# Altium PCB Switch_Matrix_32_2.PCBDOC (part 2 of 9)
Units mm, origin at the board's own origin, x right, y up, seen from the top; angles counter-clockwise.
Board outline 222.54 x 100 mm, 6 copper layers (L1, P2, L3, P4, L5, L6), stack 1.61 mm thick; 629 components, 583 nets, 2332 pads, 825 vias.
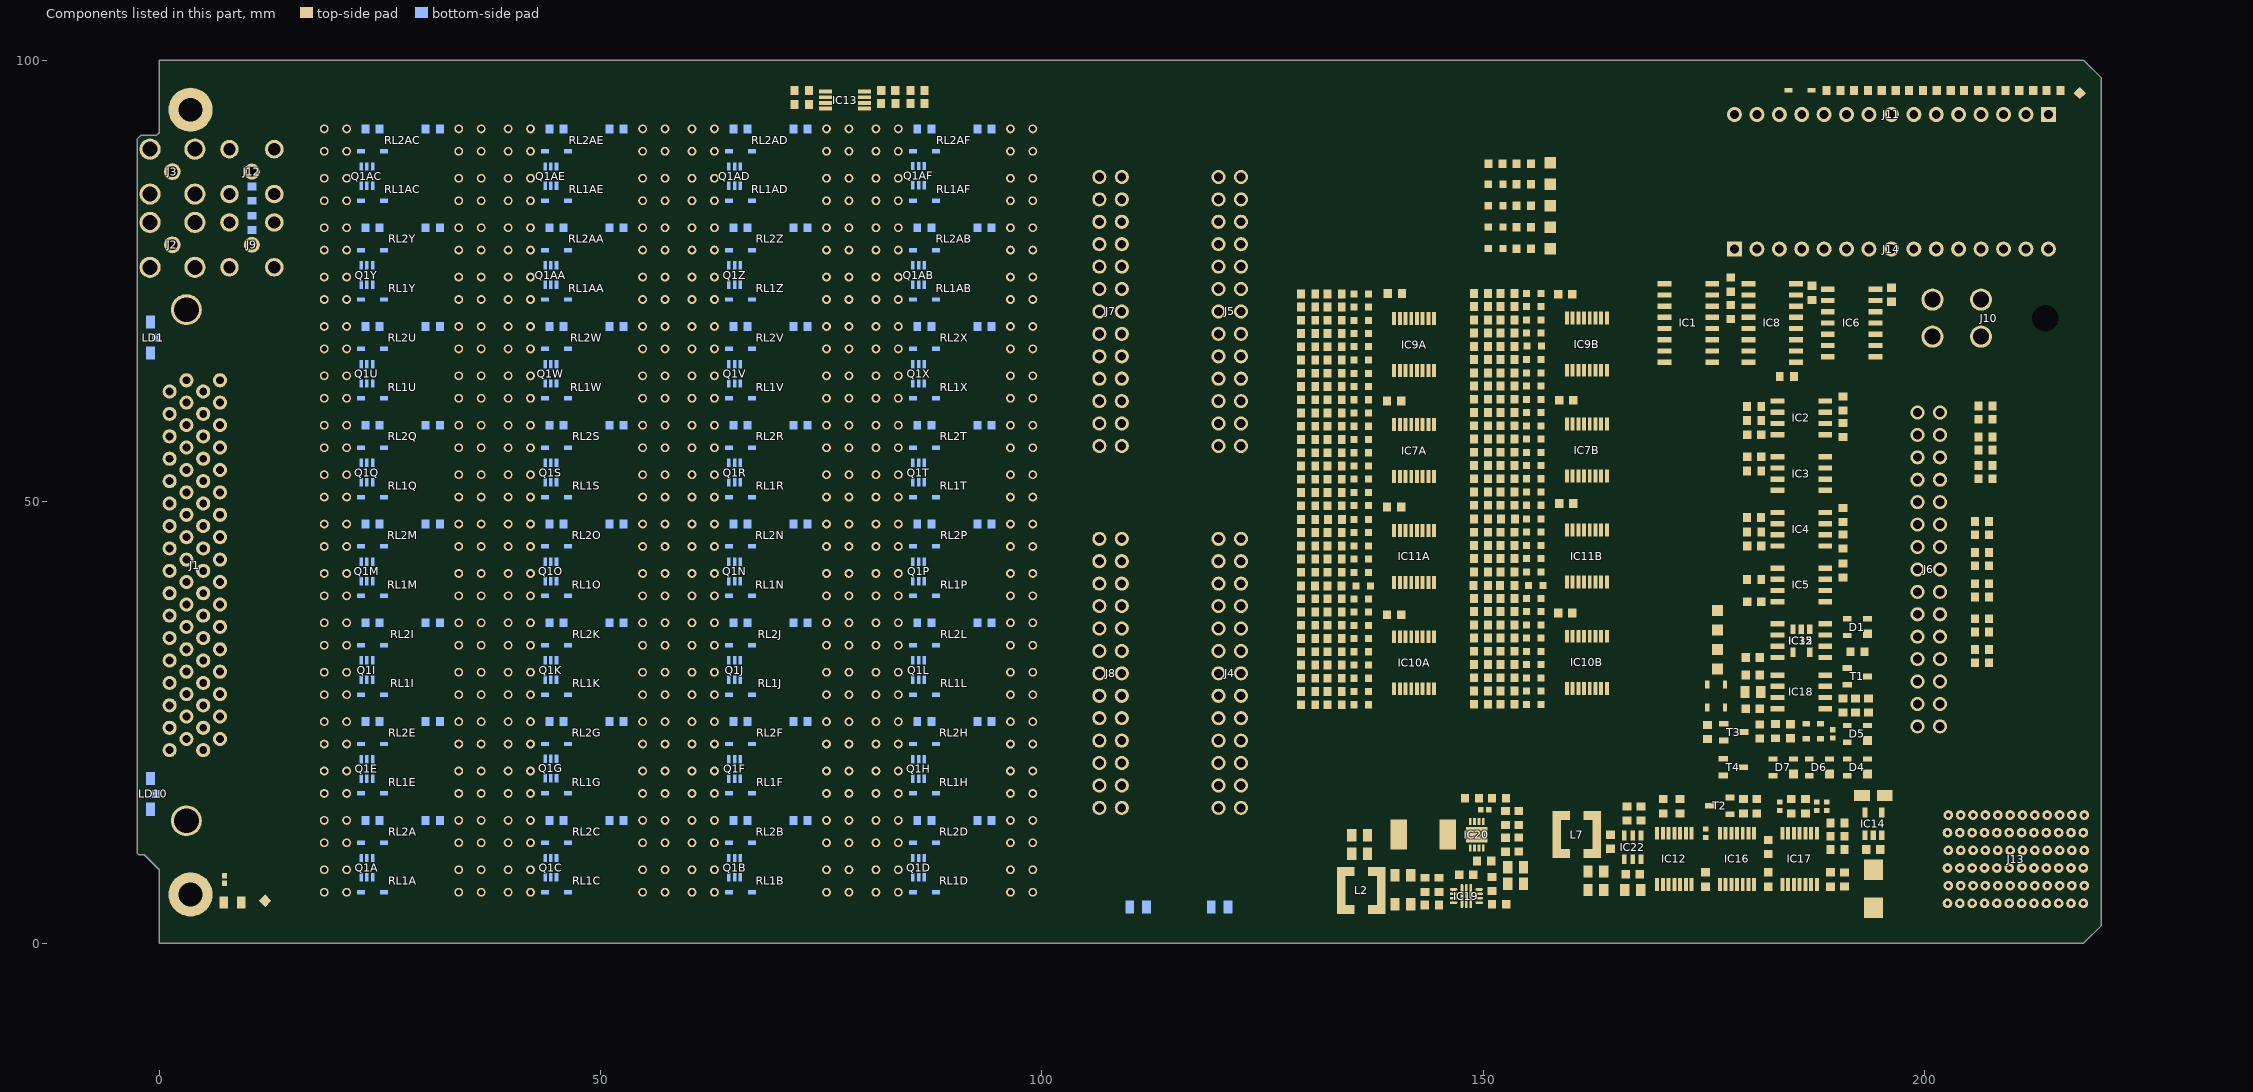
[diagram p6: the components of this part, seen from the top]

## Components (designator, comment, footprint, x,y, rotation, side; value= is the part's Value field where it differs from the comment) (continued)
R41A "2k2" RESC1608X55N 130.175,54.05 r180 top (schematic designator R41)
R41B "2k2" RESC1608X55N 149.75,54.1 r180 top (schematic designator R41)
R42A "10k" RESC1608X55N 133.175,55.55 r0 top (schematic designator R42)
R42B "10k" RESC1608X55N 152.75,55.6 r0 top (schematic designator R42)
R43A "2k2" RESC1608X55N 130.175,55.55 r180 top (schematic designator R43)
R43B "2k2" RESC1608X55N 149.75,55.6 r180 top (schematic designator R43)
R44A "10k" RESC1608X55N 133.175,57.05 r0 top (schematic designator R44)
R44B "10k" RESC1608X55N 152.75,57.1 r0 top (schematic designator R44)
R45A "2k2" RESC1608X55N 130.175,57.05 r180 top (schematic designator R45)
R45B "2k2" RESC1608X55N 149.75,57.1 r180 top (schematic designator R45)
R46A "10k" RESC1608X55N 133.175,58.55 r0 top (schematic designator R46)
R46B "10k" RESC1608X55N 152.75,58.6 r0 top (schematic designator R46)
R47A "2k2" RESC1608X55N 130.175,58.55 r180 top (schematic designator R47)
R47B "2k2" RESC1608X55N 149.75,58.6 r180 top (schematic designator R47)
R48A "10k" RESC1608X55N 133.175,60.05 r0 top (schematic designator R48)
R48B "10k" RESC1608X55N 152.75,60.1 r0 top (schematic designator R48)
R49A "2k2" RESC1608X55N 130.175,60.05 r180 top (schematic designator R49)
R49B "2k2" RESC1608X55N 149.75,60.1 r180 top (schematic designator R49)
R50A "10k" RESC1608X55N 133.175,61.55 r0 top (schematic designator R50)
R50B "10k" RESC1608X55N 152.75,61.6 r0 top (schematic designator R50)
R51A "2k2" RESC1608X55N 130.175,61.55 r180 top (schematic designator R51)
R51B "2k2" RESC1608X55N 149.75,61.6 r180 top (schematic designator R51)
R52A "10k" RESC1608X55N 133.175,63.05 r0 top (schematic designator R52)
R52B "10k" RESC1608X55N 152.75,63.1 r0 top (schematic designator R52)
R53A "2k2" RESC1608X55N 130.175,63.05 r180 top (schematic designator R53)
R53B "2k2" RESC1608X55N 149.75,63.1 r180 top (schematic designator R53)
R54A "10k" RESC1608X55N 133.175,64.55 r0 top (schematic designator R54)
R54B "10k" RESC1608X55N 152.75,64.6 r0 top (schematic designator R54)
R55A "2k2" RESC1608X55N 130.175,64.55 r180 top (schematic designator R55)
R55B "2k2" RESC1608X55N 149.75,64.6 r180 top (schematic designator R55)
R56 "24k" RESC1608X55N 167.888,14.682 r270 top
R57A "10k" RESC1608X55N 133.175,66.05 r0 top (schematic designator R57)
R57B "10k" RESC1608X55N 152.75,66.1 r0 top (schematic designator R57)
R58A "2k2" RESC1608X55N 130.175,66.05 r180 top (schematic designator R58)
R58B "2k2" RESC1608X55N 149.75,66.1 r180 top (schematic designator R58)
R59A "10k" RESC1608X55N 133.175,67.55 r0 top (schematic designator R59)
R59B "10k" RESC1608X55N 152.75,67.6 r0 top (schematic designator R59)
R60A "2k2" RESC1608X55N 130.175,67.55 r180 top (schematic designator R60)
R60B "2k2" RESC1608X55N 149.75,67.6 r180 top (schematic designator R60)
R61A "10k" RESC1608X55N 133.175,69.05 r0 top (schematic designator R61)
R61B "10k" RESC1608X55N 152.75,69.1 r0 top (schematic designator R61)
R62A "2k2" RESC1608X55N 130.175,69.05 r180 top (schematic designator R62)
R62B "2k2" RESC1608X55N 149.75,69.1 r180 top (schematic designator R62)
R63A "10k" RESC1608X55N 133.175,70.55 r0 top (schematic designator R63)
R63B "10k" RESC1608X55N 152.75,70.6 r0 top (schematic designator R63)
R64A "2k2" RESC1608X55N 130.175,70.55 r180 top (schematic designator R64)
R64B "2k2" RESC1608X55N 149.75,70.6 r180 top (schematic designator R64)
R65A "10k" RESC1608X55N 133.175,72.05 r0 top (schematic designator R65)
R65B "10k" RESC1608X55N 152.75,72.1 r0 top (schematic designator R65)
R66A "2k2" RESC1608X55N 130.175,72.05 r180 top (schematic designator R66)
R66B "2k2" RESC1608X55N 149.75,72.1 r180 top (schematic designator R66)
R67A "10k" RESC1608X55N 133.175,73.55 r0 top (schematic designator R67)
R67B "10k" RESC1608X55N 152.75,73.6 r0 top (schematic designator R67)
R68A "2k2" RESC1608X55N 130.175,73.55 r180 top (schematic designator R68)
R68B "2k2" RESC1608X55N 149.75,73.6 r180 top (schematic designator R68)
R69 "10k" RESC1608X55N 192.812,96.6 r180 top
R70 "10k" RESC1608X55N 205.262,96.6 r180 top
R71 "10k" RESC1608X55N 208.375,96.6 r0 top
R72 "10k" RESC1608X55N 151,6.7 r90 top
R73A "10k" RESC1608X55N 133.175,31.5 r0 top (schematic designator R73)
R73B "10k" RESC1608X55N 152.75,31.55 r0 top (schematic designator R73)
R74A "2k2" RESC1608X55N 130.175,31.5 r180 top (schematic designator R74)
R74B "2k2" RESC1608X55N 149.75,31.55 r180 top (schematic designator R74)
R75A "10k" RESC1608X55N 133.175,33 r0 top (schematic designator R75)
R75B "10k" RESC1608X55N 152.75,33.05 r0 top (schematic designator R75)
R76A "2k2" RESC1608X55N 130.175,33 r180 top (schematic designator R76)
R76B "2k2" RESC1608X55N 149.75,33.05 r180 top (schematic designator R76)
R77A "10k" RESC1608X55N 133.175,34.5 r0 top (schematic designator R77)
R77B "10k" RESC1608X55N 152.75,34.55 r0 top (schematic designator R77)
R78A "2k2" RESC1608X55N 130.175,34.5 r180 top (schematic designator R78)
R78B "2k2" RESC1608X55N 149.75,34.55 r180 top (schematic designator R78)
R79A "10k" RESC1608X55N 133.175,36 r0 top (schematic designator R79)
R79B "10k" RESC1608X55N 152.75,36.05 r0 top (schematic designator R79)
R80A "2k2" RESC1608X55N 130.175,36 r180 top (schematic designator R80)
R80B "2k2" RESC1608X55N 149.75,36.05 r180 top (schematic designator R80)
R81A "10k" RESC1608X55N 133.175,37.5 r0 top (schematic designator R81)
R81B "10k" RESC1608X55N 152.75,37.55 r0 top (schematic designator R81)
R82A "2k2" RESC1608X55N 130.175,37.5 r180 top (schematic designator R82)
R82B "2k2" RESC1608X55N 149.75,37.55 r180 top (schematic designator R82)
R83A "10k" RESC1608X55N 133.175,39 r0 top (schematic designator R83)
R83B "10k" RESC1608X55N 152.75,39.05 r0 top (schematic designator R83)
R84A "2k2" RESC1608X55N 130.175,39 r180 top (schematic designator R84)
R84B "2k2" RESC1608X55N 149.75,39.05 r180 top (schematic designator R84)
R85 "220" RESC1005X40N 175.2,12.43 r270 top
R86 "10k" RESC1608X55N 190.75,26.929 r270 top
R87 "75k" RESC1608X55N 214.6,96.6 r0 top
R88 "100" RESC1608X55N 190.75,42.199 r90 top
R89 "0" RESC1608X55N 192.2,26.929 r270 top
R90 "0" RESC1608X55N 85.9,95.1 r180 top
R91 "0" RESC1608X55N 82.6,95.1 r180 top
R92 "0" RESC1608X55N 85.9,96.6 r180 top
R93 "1k" RESC1608X55N 151.4,88.3 r180 top
R94 "0" RESC1608X55N 10.5,81.6 r270 bottom
R95 "10k" RESC1608X55N 178.05,71.5 r90 top
R96 "10k" RESC1608X55N 184.4,64.2 r0 top
R97 "0" RESC1608X55N 206.5,36.75 r180 top
R98A "0" RESC1608X55N 24.178,13.896 r180 bottom (schematic designator R98)
R98AA "0" RESC1608X55N 45.014,81.048 r180 bottom (schematic designator R98)
R98AB "0" RESC1608X55N 86.686,81.048 r180 bottom (schematic designator R98)
R98AC "0" RESC1608X55N 24.178,92.24 r180 bottom (schematic designator R98)
R98AD "0" RESC1608X55N 65.85,92.24 r180 bottom (schematic designator R98)
R98AE "0" RESC1608X55N 45.014,92.24 r180 bottom (schematic designator R98)
R98AF "0" RESC1608X55N 86.686,92.24 r180 bottom (schematic designator R98)
R98B "0" RESC1608X55N 65.85,13.896 r180 bottom (schematic designator R98)
R98C "0" RESC1608X55N 45.014,13.896 r180 bottom (schematic designator R98)
R98D "0" RESC1608X55N 86.686,13.896 r180 bottom (schematic designator R98)
R98E "0" RESC1608X55N 24.178,25.088 r180 bottom (schematic designator R98)
R98F "0" RESC1608X55N 65.85,25.088 r180 bottom (schematic designator R98)
R98G "0" RESC1608X55N 45.014,25.088 r180 bottom (schematic designator R98)
R98H "0" RESC1608X55N 86.686,25.088 r180 bottom (schematic designator R98)
R98I "0" RESC1608X55N 24.178,36.28 r180 bottom (schematic designator R98)
R98J "0" RESC1608X55N 65.85,36.28 r180 bottom (schematic designator R98)
R98K "0" RESC1608X55N 45.014,36.28 r180 bottom (schematic designator R98)
R98L "0" RESC1608X55N 86.686,36.28 r180 bottom (schematic designator R98)
R98M "0" RESC1608X55N 24.178,47.472 r180 bottom (schematic designator R98)
R98N "0" RESC1608X55N 65.85,47.472 r180 bottom (schematic designator R98)
R98O "0" RESC1608X55N 45.014,47.472 r180 bottom (schematic designator R98)
R98P "0" RESC1608X55N 86.686,47.472 r180 bottom (schematic designator R98)
R98Q "0" RESC1608X55N 24.178,58.664 r180 bottom (schematic designator R98)
R98R "0" RESC1608X55N 65.85,58.664 r180 bottom (schematic designator R98)
R98S "0" RESC1608X55N 45.014,58.664 r180 bottom (schematic designator R98)
R98T "0" RESC1608X55N 86.686,58.664 r180 bottom (schematic designator R98)
R98U "0" RESC1608X55N 24.178,69.856 r180 bottom (schematic designator R98)
R98V "0" RESC1608X55N 65.85,69.856 r180 bottom (schematic designator R98)
R98W "0" RESC1608X55N 45.014,69.856 r180 bottom (schematic designator R98)
R98X "0" RESC1608X55N 86.686,69.856 r180 bottom (schematic designator R98)
R98Y "0" RESC1608X55N 24.178,81.048 r180 bottom (schematic designator R98)
R98Z "0" RESC1608X55N 65.85,81.048 r180 bottom (schematic designator R98)
R99A "0" RESC1608X55N 30.99,13.896 r0 bottom (schematic designator R99)
R99AA "0" RESC1608X55N 51.826,81.048 r0 bottom (schematic designator R99)
R99AB "0" RESC1608X55N 93.498,81.048 r0 bottom (schematic designator R99)
R99AC "0" RESC1608X55N 30.99,92.24 r0 bottom (schematic designator R99)
R99AD "0" RESC1608X55N 72.662,92.24 r0 bottom (schematic designator R99)
R99AE "0" RESC1608X55N 51.826,92.24 r0 bottom (schematic designator R99)
R99AF "0" RESC1608X55N 93.498,92.24 r0 bottom (schematic designator R99)
R99B "0" RESC1608X55N 72.662,13.896 r0 bottom (schematic designator R99)
R99C "0" RESC1608X55N 51.826,13.896 r0 bottom (schematic designator R99)
R99D "0" RESC1608X55N 93.498,13.896 r0 bottom (schematic designator R99)
R99E "0" RESC1608X55N 30.99,25.088 r0 bottom (schematic designator R99)
R99F "0" RESC1608X55N 72.662,25.088 r0 bottom (schematic designator R99)
R99G "0" RESC1608X55N 51.826,25.088 r0 bottom (schematic designator R99)
R99H "0" RESC1608X55N 93.498,25.088 r0 bottom (schematic designator R99)
R99I "0" RESC1608X55N 30.99,36.28 r0 bottom (schematic designator R99)
R99J "0" RESC1608X55N 72.662,36.28 r0 bottom (schematic designator R99)
R99K "0" RESC1608X55N 51.826,36.28 r0 bottom (schematic designator R99)
R99L "0" RESC1608X55N 93.498,36.28 r0 bottom (schematic designator R99)
R99M "0" RESC1608X55N 30.99,47.472 r0 bottom (schematic designator R99)
R99N "0" RESC1608X55N 72.662,47.472 r0 bottom (schematic designator R99)
R99O "0" RESC1608X55N 51.826,47.472 r0 bottom (schematic designator R99)
R99P "0" RESC1608X55N 93.498,47.472 r0 bottom (schematic designator R99)
R99Q "0" RESC1608X55N 30.99,58.664 r0 bottom (schematic designator R99)
R99R "0" RESC1608X55N 72.662,58.664 r0 bottom (schematic designator R99)
R99S "0" RESC1608X55N 51.826,58.664 r0 bottom (schematic designator R99)
R99T "0" RESC1608X55N 93.498,58.664 r0 bottom (schematic designator R99)
R99U "0" RESC1608X55N 30.99,69.856 r0 bottom (schematic designator R99)
R99V "0" RESC1608X55N 72.662,69.856 r0 bottom (schematic designator R99)
R99W "0" RESC1608X55N 51.826,69.856 r0 bottom (schematic designator R99)
R99X "0" RESC1608X55N 93.498,69.856 r0 bottom (schematic designator R99)
R99Y "0" RESC1608X55N 30.99,81.048 r0 bottom (schematic designator R99)
R99Z "0" RESC1608X55N 72.662,81.048 r0 bottom (schematic designator R99)
R100 "0" RESC1608X55N 10.5,84.9 r90 bottom
R101 "10k" RESC1608X55N 172.3,15.5 r270 top
R102 "10k" RESC1608X55N 170.4,15.5 r270 top
R103 "10k" RESC1608X55N 181,15.5 r90 top
R104 "10k" RESC1608X55N 179.5,15.5 r270 top
R105 "10k" RESC1608X55N 190.15,13.6 r180 top
R106 "10k" RESC1608X55N 190.95,7.2 r90 top
R107 "10k" RESC1608X55N 190.15,12.1 r180 top
R108 "10k" RESC1608X55N 190.15,10.6 r180 top
R109 "10k" RESC1608X55N 186.5,15.5 r270 top
R110 "2k7" RESC1608X55N 182.3,10.9 r90 top
R111 "10k" RESC1608X55N 184.9,15.5 r270 top
R112 "0" RESC1608X55N 192.4,33 r180 top
R113 "0" RESC1608X55N 193.65,26.929 r270 top
R114 "2k7" RESC1608X55N 181.326,23.975 r90 top
R115 "10k" RESC1608X55N 175.4,23.9 r270 top
R116 "10k" RESC1608X55N 183.1,24 r270 top
R117 "10k" RESC1608X55N 143.4,6.6 r90 top
R118 "75k" RESC1608X55N 152.53,14.15 r270 top
R119 "10M" RESC2113X55N 110.9,4.1 r0 bottom
R120 "10M" RESC2113X55N 120.15,4.1 r180 bottom
R121 "75k" RESC1608X55N 148.75,16.4 r180 top
R122 "10k" RESC1608X55N 151.8,16.4 r180 top
R123 "10k" RESC1608X55N 154.03,14.15 r90 top
R124 "100" RESC1608X55N 154.03,11.15 r90 top
R125 "2k2" RESC1608X55N 154.6,81.1 r180 top
R126 "1M1" RESC2012X60N 8.3,4.6 r0 top
R127 "1k" RESC1608X55N 154.6,85.967 r180 top
R130 "22" RESC1005X40N 183.6,15.5 r90 top
R131 "22" RESC1005X40N 187.8,15.5 r90 top
R133 "22" RESC1005X40N 189.6,23.7 r90 top
R136 "22" RESC1005X40N 188.9,15.5 r90 top
R145 "0" RESC1608X55N 206.9,60.85 r180 top
R146 "0" RESC1608X55N 206.9,57.35 r180 top
R147 "0" RESC1608X55N 206.9,54.1 r180 top
R148 "0" RESC1608X55N 206.5,47.75 r180 top
R149 "0" RESC1608X55N 206.5,44.25 r180 top
R150 "0" RESC1608X55N 206.5,39.2 r180 top
R152 "0" RESC1608X55N 206.5,33.25 r180 top
R159 "1k" RESC1608X55N 154.6,88.3 r180 top
R160 "1k" RESC1608X55N 154.6,83.533 r180 top
R161 "0" RESC1608X55N 206.9,59.35 r180 top
R162 "0" RESC1608X55N 206.9,55.85 r180 top
R163 "0" RESC1608X55N 206.9,52.6 r180 top
R164 "0" RESC1608X55N 206.5,46.25 r180 top
R167 "0" RESC1608X55N 206.5,42.75 r180 top
R168 "0" RESC1608X55N 206.5,40.7 r180 top
R169 "0" RESC1608X55N 206.5,35.25 r180 top
R170 "0" RESC1608X55N 206.5,31.75 r180 top
R175 "10k" RESC1608X55N 72.8,96.6 r180 top
R177 "10k" RESC1608X55N 72.8,95 r180 top
RL1A "2342-05-000" 2342-05-000 27.584,7.03 r0 top locked value=5VDC (schematic designator RL1)
RL1AA "2342-05-000" 2342-05-000 48.42,74.182 r0 top locked value=5VDC (schematic designator RL1)
RL1AB "2342-05-000" 2342-05-000 90.092,74.182 r0 top locked value=5VDC (schematic designator RL1)
RL1AC "2342-05-000" 2342-05-000 27.584,85.374 r0 top locked value=5VDC (schematic designator RL1)
RL1AD "2342-05-000" 2342-05-000 69.256,85.374 r0 top locked value=5VDC (schematic designator RL1)
RL1AE "2342-05-000" 2342-05-000 48.42,85.374 r0 top locked value=5VDC (schematic designator RL1)
RL1AF "2342-05-000" 2342-05-000 90.092,85.374 r0 top locked value=5VDC (schematic designator RL1)
RL1B "2342-05-000" 2342-05-000 69.256,7.03 r0 top locked value=5VDC (schematic designator RL1)
RL1C "2342-05-000" 2342-05-000 48.42,7.03 r0 top locked value=5VDC (schematic designator RL1)
RL1D "2342-05-000" 2342-05-000 90.092,7.03 r0 top locked value=5VDC (schematic designator RL1)
RL1E "2342-05-000" 2342-05-000 27.584,18.222 r0 top locked value=5VDC (schematic designator RL1)
RL1F "2342-05-000" 2342-05-000 69.256,18.222 r0 top locked value=5VDC (schematic designator RL1)
RL1G "2342-05-000" 2342-05-000 48.42,18.222 r0 top locked value=5VDC (schematic designator RL1)
RL1H "2342-05-000" 2342-05-000 90.092,18.222 r0 top locked value=5VDC (schematic designator RL1)
RL1I "2342-05-000" 2342-05-000 27.584,29.414 r0 top locked value=5VDC (schematic designator RL1)
RL1J "2342-05-000" 2342-05-000 69.256,29.414 r0 top locked value=5VDC (schematic designator RL1)
RL1K "2342-05-000" 2342-05-000 48.42,29.414 r0 top locked value=5VDC (schematic designator RL1)
RL1L "2342-05-000" 2342-05-000 90.092,29.414 r0 top locked value=5VDC (schematic designator RL1)
RL1M "2342-05-000" 2342-05-000 27.584,40.606 r0 top locked value=5VDC (schematic designator RL1)
RL1N "2342-05-000" 2342-05-000 69.256,40.606 r0 top locked value=5VDC (schematic designator RL1)
RL1O "2342-05-000" 2342-05-000 48.42,40.606 r0 top locked value=5VDC (schematic designator RL1)
RL1P "2342-05-000" 2342-05-000 90.092,40.606 r0 top locked value=5VDC (schematic designator RL1)
RL1Q "2342-05-000" 2342-05-000 27.584,51.798 r0 top locked value=5VDC (schematic designator RL1)
RL1R "2342-05-000" 2342-05-000 69.256,51.798 r0 top locked value=5VDC (schematic designator RL1)
RL1S "2342-05-000" 2342-05-000 48.42,51.798 r0 top locked value=5VDC (schematic designator RL1)
RL1T "2342-05-000" 2342-05-000 90.092,51.798 r0 top locked value=5VDC (schematic designator RL1)
RL1U "2342-05-000" 2342-05-000 27.584,62.99 r0 top locked value=5VDC (schematic designator RL1)
RL1V "2342-05-000" 2342-05-000 69.256,62.99 r0 top locked value=5VDC (schematic designator RL1)
RL1W "2342-05-000" 2342-05-000 48.42,62.99 r0 top locked value=5VDC (schematic designator RL1)
RL1X "2342-05-000" 2342-05-000 90.092,62.99 r0 top locked value=5VDC (schematic designator RL1)
RL1Y "2342-05-000" 2342-05-000 27.584,74.182 r0 top locked value=5VDC (schematic designator RL1)
RL1Z "2342-05-000" 2342-05-000 69.256,74.182 r0 top locked value=5VDC (schematic designator RL1)
RL2A "2342-05-000" 2342-05-000 27.584,12.626 r0 top locked value=5VDC (schematic designator RL2)
RL2AA "2342-05-000" 2342-05-000 48.42,79.778 r0 top locked value=5VDC (schematic designator RL2)
RL2AB "2342-05-000" 2342-05-000 90.092,79.778 r0 top locked value=5VDC (schematic designator RL2)
RL2AC "2342-05-000" 2342-05-000 27.584,90.97 r0 top locked value=5VDC (schematic designator RL2)
RL2AD "2342-05-000" 2342-05-000 69.256,90.97 r0 top locked value=5VDC (schematic designator RL2)
RL2AE "2342-05-000" 2342-05-000 48.42,90.97 r0 top locked value=5VDC (schematic designator RL2)
RL2AF "2342-05-000" 2342-05-000 90.092,90.97 r0 top locked value=5VDC (schematic designator RL2)
RL2B "2342-05-000" 2342-05-000 69.256,12.626 r0 top locked value=5VDC (schematic designator RL2)
RL2C "2342-05-000" 2342-05-000 48.42,12.626 r0 top locked value=5VDC (schematic designator RL2)
RL2D "2342-05-000" 2342-05-000 90.092,12.626 r0 top locked value=5VDC (schematic designator RL2)
RL2E "2342-05-000" 2342-05-000 27.584,23.818 r0 top locked value=5VDC (schematic designator RL2)
RL2F "2342-05-000" 2342-05-000 69.256,23.818 r0 top locked value=5VDC (schematic designator RL2)
RL2G "2342-05-000" 2342-05-000 48.42,23.818 r0 top locked value=5VDC (schematic designator RL2)
RL2H "2342-05-000" 2342-05-000 90.092,23.818 r0 top locked value=5VDC (schematic designator RL2)
RL2I "2342-05-000" 2342-05-000 27.584,35.01 r0 top locked value=5VDC (schematic designator RL2)
RL2J "2342-05-000" 2342-05-000 69.256,35.01 r0 top locked value=5VDC (schematic designator RL2)
RL2K "2342-05-000" 2342-05-000 48.42,35.01 r0 top locked value=5VDC (schematic designator RL2)
RL2L "2342-05-000" 2342-05-000 90.092,35.01 r0 top locked value=5VDC (schematic designator RL2)
RL2M "2342-05-000" 2342-05-000 27.584,46.202 r0 top locked value=5VDC (schematic designator RL2)
RL2N "2342-05-000" 2342-05-000 69.256,46.202 r0 top locked value=5VDC (schematic designator RL2)
RL2O "2342-05-000" 2342-05-000 48.42,46.202 r0 top locked value=5VDC (schematic designator RL2)
RL2P "2342-05-000" 2342-05-000 90.092,46.202 r0 top locked value=5VDC (schematic designator RL2)
RL2Q "2342-05-000" 2342-05-000 27.584,57.394 r0 top locked value=5VDC (schematic designator RL2)
RL2R "2342-05-000" 2342-05-000 69.256,57.394 r0 top locked value=5VDC (schematic designator RL2)
RL2S "2342-05-000" 2342-05-000 48.42,57.394 r0 top locked value=5VDC (schematic designator RL2)
RL2T "2342-05-000" 2342-05-000 90.092,57.394 r0 top locked value=5VDC (schematic designator RL2)
RL2U "2342-05-000" 2342-05-000 27.584,68.586 r0 top locked value=5VDC (schematic designator RL2)
RL2V "2342-05-000" 2342-05-000 69.256,68.586 r0 top locked value=5VDC (schematic designator RL2)
RL2W "2342-05-000" 2342-05-000 48.42,68.586 r0 top locked value=5VDC (schematic designator RL2)
RL2X "2342-05-000" 2342-05-000 90.092,68.586 r0 top locked value=5VDC (schematic designator RL2)
RL2Y "2342-05-000" 2342-05-000 27.584,79.778 r0 top locked value=5VDC (schematic designator RL2)
RL2Z "2342-05-000" 2342-05-000 69.256,79.778 r0 top locked value=5VDC (schematic designator RL2)
SCREW1 "2 -56 UNC" TYCO_786585-2 19.1,-7.5 r180 top
SCREW2 "2 -56 UNC" TYCO_786585-2 38.5,-7.1 r180 top
T1 "BSS138LT1G" SOT95P240X110-3N 192.4,30.2 r0 top
T2 "BSS138LT1G" SOT95P240X110-3N 176.809,15.548 r180 top
T3 "BSS138LT1G" SOT95P240X110-3N 178.4,23.9 r0 top
T4 "BSS138LT1G" SOT95P240X110-3N 178.35,19.925 r0 top
TP1 "Test Point" TPS127 176.551,35.46 r0 top
TP2 "Test Point" TPS127 176.551,33.26 r0 top
TP3 "Test Point" TPS127 176.551,31.06 r0 top
TP4 "Test Point" TPS127 157.6,81.1 r180 top
TP5 "Test Point" TPS127 157.6,83.533 r180 top
TP7 "Test Point" TPS127 157.6,78.667 r90 top
TP11 "Test Point" TPS127 157.6,85.967 r180 top
TP16 "Test Point" TPS127 157.6,88.4 r90 top
TP17 "Test Point" TPS127 176.551,37.66 r180 top

## Footprints (in the part's own frame and the unit in brackets; to place one, negate y for a bottom-side part, rotate by r counter-clockwise, add the part's x,y. Pads: shape width x height; smd on the part's side, far side on the other; paste and mask are expansions set on the pad)
3M_N2526-6002RB [mm] "26 Contacts - Straight .100\" x .100\" Low Profile Four-Wall Header"
  round 1.6 hole 1: 1(-15.24,-1.27) 2(-15.24,1.27) 3(-12.7,-1.27) 4(-12.7,1.27) 5(-10.16,-1.27) 6(-10.16,1.27) 7(-7.62,-1.27) 8(-7.62,1.27) 9(-5.08,-1.27) 10(-5.08,1.27) 11(-2.54,-1.27) 12(-2.54,1.27) 13(0,-1.27) 14(0,1.27) 15(2.54,-1.27) 16(2.54,1.27) 17(5.08,-1.27) 18(5.08,1.27) 19(7.62,-1.27) 20(7.62,1.27) 21(10.16,-1.27) 22(10.16,1.27) 23(12.7,-1.27) 24(12.7,1.27) 25(15.24,-1.27) 26(15.24,1.27)
  silkscreen extent -20.17,-4.85 20.17,4.52, body extent -20.17,-4.11 20.17,4.52, height 9.91
3M_N2530-6002RB [mm] "30 Contacts - Straight .100\" x .100\" Low Profile Four-Wall Header"
  round 1.6 hole 1: 1(-17.78,-1.27) 2(-17.78,1.27) 3(-15.24,-1.27) 4(-15.24,1.27) 5(-12.7,-1.27) 6(-12.7,1.27) 7(-10.16,-1.27) 8(-10.16,1.27) 9(-7.62,-1.27) 10(-7.62,1.27) 11(-5.08,-1.27) 12(-5.08,1.27) 13(-2.54,-1.27) 14(-2.54,1.27) 15(0,-1.27) 16(0,1.27) 17(2.54,-1.27) 18(2.54,1.27) 19(5.08,-1.27) 20(5.08,1.27) 21(7.62,-1.27) 22(7.62,1.27) 23(10.16,-1.27) 24(10.16,1.27) 25(12.7,-1.27) 26(12.7,1.27) 27(15.24,-1.27) 28(15.24,1.27) 29(17.78,-1.27) 30(17.78,1.27)
  silkscreen extent -22.71,-4.85 22.71,4.52, body extent -22.71,-4.11 22.71,4.52, height 9.91
2342-05-000 [mm] "Reed Relay DPDT (2 Form C) 5VDC Coil Through Hole"
  round 1 hole 0.6: 1(-8.89,-1.27) 2(-6.35,-1.27) 3(6.35,-1.27) 4(8.89,-1.27) 5(8.89,1.27) 6(6.35,1.27) 7(-6.35,1.27) 8(-8.89,1.27)
  silkscreen extent -10.29,-2.67 10.29,2.67, body extent -9.99,-2.49 9.99,2.49, height 9.04
AMPHENOL_919-383J-51A [mm] "50 Ohm, RF Connector, MCX Right Angle PCB Receptacle Jack"
  round 1.9 hole 1.2: 1(0,0)
  round 2.4 hole 1.7: 2(-2.54,2.54) 2(-2.54,-2.54) 2(2.54,2.54) 2(2.54,-2.54)
  silkscreen extent -3,-3 6.5,3, body extent -3,-3 6.5,3, height 6
AMPHENOL_10052825-101LF [mm] "72 Contacts, 2mm Pitch, 6 Columns, 4 Pairs per Column, 4 Walls, Right Angle Header"
  round 1.1 hole 0.5: A1(-5,-7.65) A2(-3,-7.75) A3(-1,-7.65) A4(1,-7.75) A5(3,-7.65) A6(5,-7.75) B1(-5,-6.25) B2(-3,-6.35) B3(-1,-6.25) B4(1,-6.35) B5(3,-6.25) B6(5,-6.35) C1(-5,-4.85) C2(-3,-4.95) C3(-1,-4.85) C4(1,-4.95) C5(3,-4.85) C6(5,-4.95) D1(-5,-3.45) D2(-3,-3.55) D3(-1,-3.45) D4(1,-3.55) D5(3,-3.45) D6(5,-3.55) E1(-5,-2.05) E2(-3,-2.15) E3(-1,-2.05) E4(1,-2.15) E5(3,-2.05) E6(5,-2.15) F1(-5,-0.65) F2(-3,-0.75) F3(-1,-0.65) F4(1,-0.75) F5(3,-0.65) F6(5,-0.75) G1(-5,0.75) G2(-3,0.65) G3(-1,0.75) G4(1,0.65) G5(3,0.75) G6(5,0.65) H1(-5,2.15) H2(-3,2.05) H3(-1,2.15) H4(1,2.05) H5(3,2.15) H6(5,2.05) I1(-5,3.55) I2(-3,3.45) I3(-1,3.55) I4(1,3.45) I5(3,3.55) I6(5,3.45) J1(-5,4.95) J2(-3,4.85) J3(-1,4.95) J4(1,4.85) J5(3,4.95) J6(5,4.85) K1(-5,6.35) K2(-3,6.25) K3(-1,6.35) K4(1,6.25) K5(3,6.35) K6(5,6.25) L1(-5,7.75) L2(-3,7.65) L3(-1,7.75) L4(1,7.65) L5(3,7.75) L6(5,7.65)
  silkscreen extent -6.95,-21.95 6.95,11.85, body extent -6.95,-21.95 6.95,11.85, height 15.25
CAPC1005X55N [mm] "Capacitor, Non-Polarized, Chip; 1.00mm L X 0.50mm W X 0.70mm H, IPC Medium Density"
  rect 0.62x0.62 smd: 1(-0.45,0) 2(0.45,0)
  body extent -0.52,-0.27 0.53,0.28, height 0.55
CAPC1608X87N [mm] "Chip Capacitor, Body 1.6x0.8mm IPC Medium Density"
  rect 0.95x1 smd: 1(-0.8,0) 2(0.8,0)
  body extent -0.87,-0.47 0.88,0.48, height 0.87
CAPC2012X135N [mm] "Chip Capacitor, Body 2.0x1.25mm, IPC Medium Density"
  rect 1.05x1.4 smd: 1(-0.9,0) 2(0.9,0)
  silkscreen extent 0,-0.58 0,0.58, body extent -1.05,-0.67 1.05,0.68, height 1.25
CAPMP3216X180N [mm] "Capacitor, Polarized, Molded  Body 3.2x1.6mm, IPC Medium Density"
  rect 1.8x1.25 smd: 1(-1.3,0) 2(1.3,0)
  silkscreen extent -2.4,-0.7 0,1.25, body extent -1.7,-0.9 1.7,0.9, height 1.6
DIOM5336X265N [mm] "DO-214-AA/SMB Diode, Molded Body; 5.34mm L X 3.625mm W X 2.65mm H, IPC Medium Density"
  rect 2.3x2.15 smd: 1(-2.15,0) 2(2.15,0)
  silkscreen extent -3.92,-1.8 2.65,1.8, body extent -2.7,-1.95 2.7,1.95, height 2.4
FIDUCIAL_TOP_C100-200 [mm] "Round Fiducial Target, Top Layer, 1.0mm, Top Solder 2.0mm, Keepout =2.0mm"
  round 1 smd paste-0.51 mask+0.5: FTG2(0,0)
  L1 keep-out circle w0.1: c0,0 r1
FIDUCIAL_TOP_S100-200 [mm] "Square Fiducial Target, Top Layer, 1.0mm, Top Solder 2.0mm, Keepout =2.0mm"
  rect 1x1 smd rot 45 paste-0.51 mask+0.5: 1(0,0)
  L1 keep-out region: 1.414,0 0,-1.414 -1.414,0 0,1.414
IND_TDK_SPM6530 [mm] "SMD Inductor, 7.1mm L X 6.5mm W X 3mm H, TDK SPM6530 Series"
  rect 1.85x3.4 smd: 1(-2.775,0) 2(2.775,0)
  silkscreen extent -3.5,-3.2 3.5,3.2, body extent -3.6,-3.2 3.6,3.2, height 3.1
IND_WURTH_WE-TPC_4828 [mm] "Shielded Tiny Power Inductor, Body 4.8x4.8mm"
  rect 0.95x5.3 smd: 1(-2.275,0) 2(2.275,0)
  rect 1.05x1.014 smd: 1(-1.275,2.143) 1(-1.275,-2.143) 2(1.275,2.143) 2(1.275,-2.143)
  L1 region: 2.75,-2.65 0.75,-2.65 0.75,-1.636 1.394,-1.138 1.753,-0.407 1.753,0.407 1.394,1.138 0.75,1.636 0.75,1.636 0.75,2.65 2.75,2.65
  L1 region: -2.75,-2.65 -0.75,-2.65 -0.75,-1.636 -1.394,-1.138 -1.753,-0.407 -1.753,0.407 -1.394,1.138 -0.75,1.636 -0.75,1.636 -0.75,2.65 -2.75,2.65
  L1 region: 0.75,-2.65 2.75,-2.65 2.75,2.65 0.75,2.65 0.75,1.636 1.394,1.138 1.753,0.407 1.753,-0.407 1.394,-1.138 0.75,-1.636 0.75,-1.636
  silkscreen extent -0.35,-2.4 0.35,2.4, body extent -2.4,-2.4 2.4,2.4, height 2.8
LED_AVAGO_HSMC-C110 [mm] "Red Chip LED, 2-Leads, Body 3.3x1.6mm, Side Emitting Package"
  rect 1.5x1 smd: 1(-1.75,0) 2(1.75,0)
  rect 0.9x0.9 smd: 3(0,-0.65)
  silkscreen extent -1.87,-1.28 0.86,1.3, body extent -1.65,-0.3 1.65,1.29, height 1
LED_AVAGO_HSME-C110 [mm] "Green Chip LED, 2-Leads, Body 3.3x1.6mm, Side Emitting Package"
  rect 1.5x1 smd: 1(-1.75,0) 2(1.75,0)
  rect 0.9x0.9 smd: 3(0,-0.65)
  silkscreen extent -1.87,-1.28 0.86,1.3, body extent -1.65,-0.3 1.65,1.29, height 1
LED_KINGBRIGHT_KP-1608CGCK [mm] "SMT Green LED, Case 0603, Body L 1.60mm x W 0.80mm x H 1.10mm"
  rect 0.8x0.8 smd: 1(-0.825,0) 2(0.825,0)
  silkscreen extent -1.83,-0.4 0.08,0.4, body extent -0.8,-0.4 0.8,0.4, height 1.1
LED_KINGBRIGHT_KPH-1608CGCK [mm] "SMT Green LED, Case 0603, Body L 1.6 x W 0.8mm H 0.65mm"
  rect 0.8x0.8 smd: 1(-0.825,0) 2(0.825,0)
  silkscreen extent -1.82,-0.4 0.08,0.4, body extent -0.8,-0.4 0.8,0.4, height 0.65
MOLEX_39-30-0040 [mm] "4.20mm (.165\") Pitch Mini-Fit Jr. Header, Dual Row, Right Angle with Snap-in Plastic Peg PCB Lock, 4 Circuits"
  round 2.5 hole 1.8: 1(-2.1,2.75) 2(2.1,2.75) 3(-2.1,-2.75) 4(2.1,-2.75)
  round 1 hole 3 unplated mask+1: 5(0,10.05)
  silkscreen extent -5.2,-1.24 4.8,16.65, body extent -5.2,-3.28 4.8,16.65, height 11.4
MTG270_500 [mm] "Plated Through Hole: Hole Dia.=2.7mm Pad Dia.=5.0mm"
  round 5 / inner round 4 / far side round 5 hole 2.7: 1(0,0)
"PCBM_ARDUINO NANO RP2040" [mm] "Arduino NANO RP2040 Printed Circuit Board Module"
  silkscreen extent -23.05,-8.89 21.6,8.89, body extent -23.05,-8.89 21.6,8.89, height 15.33
RESC1005X40N [mm] "Chip Resistor, EIA 0402, Metric 1005, Body 1.0x0.5mm, IPC Medium Density"
  rect 0.58x0.62 smd: 1(-0.47,0) 2(0.47,0)
  body extent -0.52,-0.27 0.53,0.28, height 0.4
RESC1608X55N [mm] "Chip Resistor, EIA 0603, Metric 1608, Body 1.6x0.8mm, IPC Medium Density"
  rect 0.9x1 smd: 1(-0.8,0) 2(0.8,0)
  body extent -0.87,-0.47 0.88,0.48, height 0.55
RESC2012X60N [mm] "Chip Resistor, EIA 0805, Metric 2012, Body 2.0x1.2mm, IPC Medium Density"
  rect 0.95x1.4 smd: 1(-1,0) 2(1,0)
  silkscreen extent 0,-0.55 0,0.55, body extent -1.1,-0.67 1.1,0.68, height 0.6
RESC2113X55N [mm] "Chip Resistor, EIA 0805, Metric 2113, Body 2.05x1.3mm, IPC Medium Density"
  rect 1x1.45 smd: 1(-0.95,0) 2(0.95,0)
  silkscreen extent 0,-0.55 0,0.55, body extent -1,-0.62 1,0.63, height 0.55
SAMTEC_MCX-J-P-H-ST-TH1 [mm] "Straight Through-hole 50 Ohm Mini RF Jack, MCX Serie"
  round 1.8 hole 1.1: 1(0,0)
  round 2.1 hole 1.4: 2(-2.54,-2.54) 2(-2.54,2.54) 2(2.54,-2.54) 2(2.54,2.54)
  silkscreen extent -3,-3 3,3, body extent -3,-3 3,3, height 5.81
SAMTEC_SSW-115-01-X-S [mm] "15 Contacts, Pitch 2.54mm, Single Row Through Mount Straight Socket (Lead Length 2.64mm)"
  rect 1.7x1.7 hole 1: 1(-17.78,0)
  round 1.7 hole 1: 2(-15.24,0) 3(-12.7,0) 4(-10.16,0) 5(-7.62,0) 6(-5.08,0) 7(-2.54,0) 8(0,0) 9(2.54,0) 10(5.08,0) 11(7.62,0) 12(10.16,0) 13(12.7,0) 14(15.24,0) 15(17.78,0)
  silkscreen extent -19.3,-1.21 19.3,1.95, body extent -19.3,-1.21 19.3,1.21, height 8.51
SOD2512X110N [mm] "Small Outline Diode (SOD-323), 1.70mm W X 1.25mm L X 1.10mm H body,  IPC Medium Density"
  rect 0.9x0.5 smd: 1(-1.3,0) 2(1.3,0)
  silkscreen extent -1.62,-0.65 0.85,0.88, body extent -1.35,-0.67 1.35,0.68, height 1.1
SOD-523F [mm] "Small Outline Diode Flat Lead (SOD-523F), Body; 1.80mm L X 1mm W X 0.85mm H"
  rect 0.6x0.8 smd: 1(-0.85,0) 2(0.85,0)
  silkscreen extent -1.87,-0.5 0.2,0.52, body extent -0.91,-0.5 0.89,0.5, height 0.85
SOIC127P600X175-8N [mm] "SOIC 8, Pitch 1.27mm - Body 4x5mm, IPC Medium Density"
  rect 1.55x0.6 smd: 1(-2.7,1.905) 2(-2.7,0.635) 3(-2.7,-0.635) 4(-2.7,-1.905) 5(2.7,-1.905) 6(2.7,-0.635) 7(2.7,0.635) 8(2.7,1.905)
  silkscreen extent -2.53,-2.5 1.55,2.88, body extent -3.1,-2.5 3.1,2.5, height 1.75
SOIC127P600X175-14N [mm] "SOIC 14, Pitch 1.27mm - Body 4x8.75mm, IPC Medium Density"
  rect 1.55x0.6 smd: 1(-2.7,3.81) 2(-2.7,2.54) 3(-2.7,1.27) 4(-2.7,0) 5(-2.7,-1.27) 6(-2.7,-2.54) 7(-2.7,-3.81) 8(2.7,-3.81) 9(2.7,-2.54) 10(2.7,-1.27) 11(2.7,0) 12(2.7,1.27) 13(2.7,2.54) 14(2.7,3.81)
  silkscreen extent -2.52,-4.4 1.55,4.78, body extent -3.1,-4.37 3.1,4.38, height 1.75
SOIC127P600X175-16N [mm] "SOIC 16, Pitch 1.27mm - Body 4x10mm, IPC Medium Density"
  rect 1.55x0.6 smd: 1(-2.7,4.445) 2(-2.7,3.175) 3(-2.7,1.905) 4(-2.7,0.635) 5(-2.7,-0.635) 6(-2.7,-1.905) 7(-2.7,-3.175) 8(-2.7,-4.445) 9(2.7,-4.445) 10(2.7,-3.175) 11(2.7,-1.905) 12(2.7,-0.635) 13(2.7,0.635) 14(2.7,1.905) 15(2.7,3.175) 16(2.7,4.445)
  silkscreen extent -2.45,-5 1.55,5.37, body extent -3.1,-5 3.1,5, height 1.75
SON50P300X300X80-9N-R175X248 [mm] "SON, (DFN) 0.50mm,pitch; 8 pin,3.00mm W X 3.00mm L X 0.80mm H body (w/thermal tab 1.75 X2.48mm), IPC Medium Density"
  rect 0.8x0.3 smd: 1(-1.5,0.75) 2(-1.5,0.25) 3(-1.5,-0.25) 4(-1.5,-0.75) 5(1.5,-0.75) 6(1.5,-0.25) 7(1.5,0.25) 8(1.5,0.75)
  rect 1.75x2.45 smd: 9(0,0)
  silkscreen extent -2.52,-1.5 1.5,1.5, body extent -1.55,-1.55 1.55,1.55, height 0.8
SOP65P490X109-8N [mm] "SOP, 0.65mm pitch; 8 pin,3.00mm W X 3.00mm L X 1.09mm H bodyI, PC Medium Density"
  rect 1.5x0.45 smd: 1(-2.2,0.975) 2(-2.2,0.325) 3(-2.2,-0.325) 4(-2.2,-0.975) 5(2.2,-0.975) 6(2.2,-0.325) 7(2.2,0.325) 8(2.2,0.975)
  silkscreen extent -2.82,-1.5 1.12,1.82, body extent -2.45,-1.55 2.45,1.55, height 1.09
SOP65P640X110-14N [mm] "SOP, 14-Leads, Body 4.4x5mm (max), Pitch 0.65mm, IPC Medium Density"
  rect 1.45x0.45 smd: 1(-2.9,1.95) 2(-2.9,1.3) 3(-2.9,0.65) 4(-2.9,0) 5(-2.9,-0.65) 6(-2.9,-1.3) 7(-2.9,-1.95) 8(2.9,-1.95) 9(2.9,-1.3) 10(2.9,-0.65) 11(2.9,0) 12(2.9,0.65) 13(2.9,1.3) 14(2.9,1.95)
  silkscreen extent -3.47,-2.5 1.85,2.83, body extent -3.12,-2.55 3.12,2.55, height 1.1
SOP65P640X120-16N [mm] "SOP, 0.65mm pitch; 16 pin, 4.40mm W X 5.00mm L X 1.20mm H body IPC Medium Density"
  rect 1.45x0.45 smd: 1(-2.95,2.275) 2(-2.95,1.625) 3(-2.95,0.975) 4(-2.95,0.325) 5(-2.95,-0.325) 6(-2.95,-0.975) 7(-2.95,-1.625) 8(-2.95,-2.275) 9(2.95,-2.275) 10(2.95,-1.625) 11(2.95,-0.975) 12(2.95,-0.325) 13(2.95,0.325) 14(2.95,0.975) 15(2.95,1.625) 16(2.95,2.275)
  silkscreen extent -3.07,-2.55 1.85,3.17, body extent -3.12,-2.55 3.12,2.55, height 1.2
SOT65P210X110-6N [mm] "SOT363, SC70-6, SOT, 0.65mm Pitch, 6 Pin, 1.25mm W X 2.00mm L X 1.10mm H, IPC Medium Density"
  rect 0.95x0.4 smd: 1(-1.1,0.65) 2(-1.1,0) 3(-1.1,-0.65) 4(1.1,-0.65) 5(1.1,0) 6(1.1,0.65)
  silkscreen extent -1.42,-1 0.3,1.48, body extent -1.2,-1.1 1.2,1.1, height 1.1
SOT95P240X110-3N [mm] "SOT23 3-Leads, Pitch 0.95mm, Body 1.3x2.9mm, IPC Medium Density"
  rect 1.05x0.65 smd: 1(-1.15,0.95) 2(-1.15,-0.95) 3(1.15,0)
  silkscreen extent -1.52,-1.45 0.3,1.92, body extent -1.25,-1.5 1.25,1.5, height 1.1
SOT95P280X100-6N [mm] "SOT23, 0.95mm pitch; 6 pin, 1.625mm W X 2.90mm L X 1.00mm H body, IPC Medium Density"
  rect 1.1x0.55 smd: 1(-1.35,0.95) 2(-1.35,0) 3(-1.35,-0.95) 4(1.35,-0.95) 5(1.35,0) 6(1.35,0.95)
  silkscreen extent -1.77,-1.45 0.48,1.87, body extent -1.4,-1.5 1.4,1.5, height 1
SOT95P280X145-5N [mm] "SOT, 0.95mm pitch; 5 pin, 1.60mm W X 2.90mm L X 1.45mm H body, IPC Medium Density"
  rect 1.1x0.6 smd: 1(-1.3,0.95) 2(-1.3,0) 3(-1.3,-0.95) 4(1.3,-0.95) 5(1.3,0.95)
  silkscreen extent -1.72,-1.45 0.43,1.87, body extent -1.4,-1.5 1.4,1.5, height 1.45
SOT190P230X110-4N [mm] "SOT143, SOT, 1.90mm Pitch; 4 Pin, 1.30mm W X 2.90mm L X 1.10mm H body, IPC Medium Density"
  rect 1x1 smd: 1(-1.15,0.75)
  rect 1x0.6 smd: 2(-1.15,-0.95) 3(1.15,-0.95) 4(1.15,0.95)
  silkscreen extent -1.53,-1.45 0.33,1.87, body extent -1.25,-1.5 1.25,1.5, height 1.1
TEXAS_RGX0011A [mm] "TEXAS Case Style (R-VQFN-HR-N11), 0.50mm Pitch, 11-pin, 2.00mm W X 3.00mm L X 1.00mm H Body"
  oval 2.75x0.3 smd: 1(0,0.5) 2(0,0) 3(0,-0.5)
  oval 0.3x0.85 smd: 4(-0.75,-1.45) 5(-0.25,-1.45) 6(0.25,-1.45) 7(0.75,-1.45) 8(0.75,1.45) 9(0.25,1.45) 10(-0.25,1.45) 11(-0.75,1.45)
  silkscreen extent -2.07,0.38 -1.83,0.63, body extent -1,-1.5 1,1.5, height 1
TPS127 [mm] "1.27 x  1.27mm SMD Test Point Area"
  rect 1.27x1.27 smd paste-1.27: 1(0,0)
  silkscreen extent -0.94,-0.94 0.94,0.94
TYCO_786585-2 [mm] "50SR SCREWLOCK KIT, FEMALE"
  silkscreen extent -4.04,-2.74 5.26,2.74, body extent -9.01,-2.74 5.26,2.74, height 2.37
TYCO_5787082-7 [mm] "68 contacts, AMPLIMITE .050\", Right Angled Receptacle Series III"
  round 1.6 hole 0.9: 1(20.955,0.952) 2(19.685,2.858) 3(18.415,0.952) 4(17.145,2.858) 5(15.875,0.952) 6(14.605,2.858) 7(13.335,0.952) 8(12.065,2.858) 9(10.795,0.952) 10(9.525,2.858) 11(8.255,0.952) 12(6.985,2.858) 13(5.715,0.952) 14(4.445,2.858) 15(3.175,0.952) 16(1.905,2.858) 17(0.635,0.952) 18(-0.635,2.857) 19(-1.905,0.952) 20(-3.175,2.857) 21(-4.445,0.952) 22(-5.715,2.857) 23(-6.985,0.952) 24(-8.255,2.857) 25(-9.525,0.952) 26(-10.795,2.857) 27(-12.065,0.952) 28(-13.335,2.857) 29(-14.605,0.952) 30(-15.875,2.857) 31(-17.145,0.952) 32(-18.415,2.857) 33(-19.685,0.952) 34(-20.955,2.857) 35(20.955,-2.858) 36(19.685,-0.953) 37(18.415,-2.858) 38(17.145,-0.953) 39(15.875,-2.858) 40(14.605,-0.953) 41(13.335,-2.858) 42(12.065,-0.953) 43(10.795,-2.858) 44(9.525,-0.953) 45(8.255,-2.858) 46(6.985,-0.953) 47(5.715,-2.858) 48(4.445,-0.953) 49(3.175,-2.858) 50(1.905,-0.953) 51(0.635,-2.858) 52(-0.635,-0.953) 53(-1.905,-2.858) 54(-3.175,-0.953) 55(-4.445,-2.858) 56(-5.715,-0.953) 57(-6.985,-2.858) 58(-8.255,-0.953) 59(-9.525,-2.858) 60(-10.795,-0.953) 61(-12.065,-2.858) 62(-13.335,-0.953) 63(-14.605,-2.858) 64(-15.875,-0.953) 65(-17.145,-2.858) 66(-18.415,-0.953) 67(-19.685,-2.858) 68(-20.955,-0.953)
  round 3.5 hole 2.8: 69(-28.955,-0.953) 70(28.955,-0.952)
  silkscreen extent -31.94,-12.74 31.94,5.05, body extent -31.94,-12.74 31.94,4.13, height 9.5

## Part data
B1 B7: library part PLATED_HOLE2.7_PAD5.0, "Single Terminal Socket", Author="CERN DEM JMW", ComponentHeight=0mm, Component Type="Standard (No BOM)", CreateDate=27.09.2011, Family="Plated Hole", HelpURL=Undefined, LatestRevisionDate=27.09.2011, Mounted=No, PackageDescription="Plated Through Hole: Hole Dia.=2.7mm Pad Dia.=5.0mm", Part Description="Plated Through Hole: Hole Dia.=2.7mm Pad Dia.=5.0mm", Part Number=PLATED_HOLE2.7_PAD5.0, Pin Count=1, Sense=No, SMD=No, Socket=No, Status=None
C1 C2 C3 C4 C5 C6 C7 C8 C9 C10 C11 C18A C18B C19A C19B C20A C20B C21A C21B C22 C24 C26 C27 C29 C30 C31 C32 C38 C47 C58 C93 C102: library part CC0603_100NF_50V_10%_X7R, "Non-polarised capacitor", Case=0603, Manufacturer=GENERIC, Manufacturer1 ComponentHeight=0.87mm, Manufacturer1 Example=PHYCOMP, Manufacturer1 Part Number=223858615649, Tolerance=±10%, Voltage=50V, Author="CERN DEM JLC", Component Type=Standard, CreateDate=03.12.2007, HelpURL=\\cern.ch\dfs\Applications\Altium\Datasheets\CC0603_X7R_PHYCOMP.pdf, LatestRevisionDate=03.12.2007, Manufacturer Part Number=CC0603_100NF_50V_10%_X7R, Mounted=Yes, Part Description="SMD Multilayer Chip Ceramic Capacitor", Part Number=CC0603_100NF_50V_10%_X7R, Pin Count=2, Sense=No, SMD=Yes, Socket=No, Status=Preferred, TC=X7R
C12 C13 C14 C15 C16 C17 C25 C110 C121 C123: library part CC0805_22UF_16V_10%_X5R, "Non-polarised capacitor", Case=0805, Manufacturer=GENERIC, Manufacturer1 ComponentHeight=1.35mm, Manufacturer1 Example=TDK, Manufacturer1 Part Number=C2012X5R1C226KT, Tolerance=±10%, Voltage=16V, Author="CERN DEM JLC", Component Type=Standard, CreateDate=25.10.2012, HelpURL=\\cern.ch\dfs\Applications\Altium\Datasheets\CC0805_X5R_TDK_C.pdf, LatestRevisionDate=25.10.2012, Manufacturer Part Number=CC0805_22UF_16V_10%_X5R, Mounted=Yes, Part Description="SMD Multilayer Chip Ceramic Capacitor", Part Number=CC0805_22UF_16V_10%_X5R, Pin Count=2, Sense=No, SMD=Yes, Socket=No, Status=Preferred, TC=X5R
C23: library part CTE3216-18_4.7UF_10V_10%_AVX_TPSA475K010T1400, "Polarised capacitor", Case=A, Manufacturer=AVX, Manufacturer Part Number=TPSA475K010T1400, Tolerance=±10%, Voltage=10V, Author="CERN DEM JLC", Component Type=Standard, ComponentHeight=1.8mm, CreateDate=23.01.2018, HelpURL=\\cern.ch\dfs\Applications\Altium\Datasheets\CTE-LESR_AVX_TPS-AUTO.pdf, LatestRevisionDate=23.01.2018, Mounted=Yes, Part Description="Low ESR 1R4 Automotive Solid Tantalum Chip Capacitor", Part Number=CTE3216-18_4.7UF_10V_10%_AVX_TPSA475K010T1400, Pin Count=2, Sense=No, SMD=Yes, Socket=No, Status=Preferred
C28: library part CC0603_1UF_16V_10%_X7R, "Non-polarised capacitor", Case=0603, Manufacturer=GENERIC, Manufacturer1 ComponentHeight=0.9mm, Manufacturer1 Example="YAGEO PHYCOMP", Manufacturer1 Part Number=223878615663, Tolerance=±10%, Voltage=16V, Author="CERN DEM JLC", Component Type=Standard, CreateDate=03.12.2007, HelpURL=\\cern.ch\dfs\Applications\Altium\Datasheets\CC0603_X7R_PHYCOMP.pdf, LatestRevisionDate=17.04.2015, Manufacturer Part Number=CC0603_1UF_16V_10%_X7R, Mounted=Yes, Part Description="SMD Multilayer Chip Ceramic Capacitor", Part Number=CC0603_1UF_16V_10%_X7R, Pin Count=2, Sense=No, SMD=Yes, Socket=No, Status=None, TC=X7R
C33: library part CC0402_2.2UF_16V_10%_X5R, "Non-polarised capacitor", Case=0402, Manufacturer=GENERIC, Manufacturer1 ComponentHeight=0.55mm, Manufacturer1 Example=TDK, Manufacturer1 Part Number=C1005X5R1C225K050, Tolerance=±10%, Voltage=16V, Author="CERN DEM BC", Component Type=Standard, CreateDate=08.02.2021, HelpURL=\\cern.ch\dfs\Applications\Altium\Datasheets\CC0402_X5R_TDK_C.pdf, LatestRevisionDate=08.02.2021, Manufacturer Part Number=CC0402_2.2UF_16V_10%_X5R, Mounted=Yes, Part Description="SMD Multilayer Chip Ceramic Capacitor", Part Number=CC0402_2.2UF_16V_10%_X5R, Pin Count=2, Sense=No, SMD=Yes, Socket=No, Status=Preferred, TC=X5R
C40: library part CC0603_1UF_25V_10%_X7R, "Non-polarised capacitor", Case=0603, Manufacturer=GENERIC, Manufacturer1 ComponentHeight=0.9mm, Manufacturer1 Example=MURATA, Manufacturer1 Part Number=GRM188R71E105KA12D, Tolerance=±10%, Voltage=25V, Author="CERN DEM JLC", Component Type=Standard, CreateDate=18.01.2011, HelpURL=\\cern.ch\dfs\Applications\Altium\Datasheets\CC0603_X7R_MURATA.pdf, LatestRevisionDate=18.01.2011, Manufacturer Part Number=CC0603_1UF_25V_10%_X7R, Mounted=Yes, Part Description="SMD Multilayer Chip Ceramic Capacitor", Part Number=CC0603_1UF_25V_10%_X7R, Pin Count=2, Sense=No, SMD=Yes, Socket=No, Status=None, TC=X7R
C212: library part CC0402_22PF_50V_5%_C0G, "Non-polarised capacitor", Case=0402, Manufacturer=GENERIC, Manufacturer1 ComponentHeight=0.55mm, Manufacturer1 Example=KEMET, Manufacturer1 Part Number=C0402C220J5GACTU, Tolerance=±5%, Voltage=50V, Author="CERN DEM JLC", Component Type=Standard, CreateDate=2007-12-03, HelpURL="\\cern.ch\dfs\Applications\Altium\Datasheets\CC0402_C0G_KEMET_(Commercial Grade).pdf", LatestRevisionDate=2007-12-03, Manufacturer Part Number=CC0402_22PF_50V_5%_C0G, Mounted=Yes, Part Description="SMD Multilayer Chip Ceramic Capacitor", Part Number=CC0402_22PF_50V_5%_C0G, Pin Count=2, Sense=No, SMD=Yes, Socket=No, Status=Preferred, TC=C0G/NP0
D1 D4 D5 D6 D7: "Ultra Low Capacitance Double Rail-to-Rail ESD Protection Diode", Case=SOT143B, Manufacturer="NXP SEMICONDUCTORS", Voltage=5.5V, Author="CERN DEM JLC", Bonding=No, Component Type=Standard, ComponentHeight=1.1mm, CreateDate=22.03.2011, Device=PRTR5V0U2X, HelpURL=\\cern.ch\dfs\Applications\Altium\Datasheets\PRTR5V0U2X.pdf, LatestRevisionDate=22.03.2011, Manufacturer Part Number=PRTR5V0U2X, Mounted=Yes, PackageDescription="SOT143B, SOT, 1.90mm Pitch; 4 Pin, 1.30mm W X 2.90mm L X 1.10mm H body, IPC Medium Density", Part Description="Ultra Low Capacitance (1pF) Double Rail-to-Rail ESD Protection Diode (8kV)", Part Number=PRTR5V0U2X, Pin Count=4, PressFit=No, Sense=No, SMD=Yes, Socket=No
D2 D3 D12A D12AA D12AB D12AC D12AD D12AE D12AF D12B D12C D12D D12E D12F D12G D12H D12I D12J D12K D12L D12M D12N D12O D12P D12Q D12R D12S D12T D12U D12V D12W D12X D12Y D12Z D13A D13AA D13AB D13AC D13AD D13AE D13AF D13B D13C D13D D13E D13F D13G D13H D13I D13J D13K D13L D13M D13N D13O D13P D13Q D13R D13S D13T D13U D13V D13W D13X D13Y D13Z: "Schottky Diode", Case=SOD-323, Manufacturer=INFINEON, Power=750mA, Voltage=40V, Author="CERN DEM JLC", Bonding=No, Component Type=Standard, ComponentHeight=1.1mm, CreateDate=12.11.2014, Device=BAT165, HelpURL=\\cern.ch\dfs\Applications\Altium\Datasheets\BAT165.pdf, LatestRevisionDate=12.11.2014, Manufacturer Part Number=BAT165, Mounted=Yes, PackageDescription="Small Outline Diode (SOD-323), 1.70mm W X 1.25mm L X 1.10mm H body,  IPC Medium Density", Part Description="Medium Power AF Schottky Diode", Part Number=BAT165, Pin Count=2, PressFit=No, Sense=No, SMD=Yes, Socket=No
D8 D9: "Schottky Diode", Case=SOD-523F, Manufacturer=COMCHIP, Power=500mA, Voltage=20V, Author="CERN DEM HF", Bonding=No, Component Type=Standard, ComponentHeight=1mm, CreateDate=13.10.2023, Device=CDBU0520-HF, HelpURL=\\cern.ch\dfs\Applications\Altium\Datasheets\CDBU0520-HF.pdf, LatestRevisionDate=13.10.2023, Manufacturer Part Number=CDBU0520-HF, Mounted=Yes, PackageDescription="Small Outline Diode Flat Lead (SOD-523F), Body; 1.80mm L X 1mm W X 0.85mm H", Part Description="20V Surface mount Schottky Barrier Diode", Part Number=CDBU0520-HF, Pin Count=2, PressFit=No, Sense=No, SMD=Yes, Socket=No
D10: "Zener Diode", Case=DO-214AA, Manufacturer="FAIRCHILD SEMICONDUCTOR", Power=600W, Voltage=12V, Author="CERN DEM JLC", Bonding=No, Component Type=Standard, ComponentHeight=2.65mm, CreateDate=10.04.2013, Device=SMBJ12A, HelpURL=\\cern.ch\dfs\Applications\Altium\Datasheets\SMBJ.pdf, LatestRevisionDate=10.04.2013, Manufacturer Part Number=SMBJ12A, Mounted=Yes, PackageDescription="DO-214-AA/SMB Diode, Molded Body; 5.34mm L X 3.625mm W X 2.65mm H, IPC Medium Density", Part Description="Uni-Directional Transient Voltage Suppressor Diode", Part Number=SMBJ12A, Pin Count=2, PressFit=No, Sense=No, SMD=Yes, Socket=No
D11: "Schottky Diode", Case=SOD323, Manufacturer=INFINEON, Power=750mA, Voltage=40V, Author="CERN DEM JLC", Bonding=No, Component Type=Standard, ComponentHeight=1.1mm, CreateDate=12.11.2014, Device=BAT165, HelpURL=\\cern.ch\dfs\Applications\Altium\Datasheets\BAT165.pdf, LatestRevisionDate=12.11.2014, Manufacturer Part Number=BAT165, Mounted=Yes, PackageDescription="Small Outline Diode (SOD-323), 1.70mm W X 1.25mm L X 1.10mm H body,  IPC Medium Density", Part Description="Medium Power AF Schottky Diode", Part Number=BAT165, Pin Count=2, PressFit=No, Sense=No, SMD=Yes, Socket=No
FTG1: library part FIDUCIAL_TARGET_C100-200, "Fiducial Target", Author="CERN DEM JLC", ComponentHeight=0mm, Component Type="Standard (No BOM)", CreateDate=09.02.2010, Family=Fiducial, HelpURL=Undefined, LatestRevisionDate=04.04.2012, Mounted=No, PackageDescription="Round Fiducial Target, Top Layer, 1.0mm, Top Solder 2.0mm, Keepout =2.0mm", Part Description="Round Fiducial Target, Top Layer, 1.0mm, Top Solder 2.0mm, Keepout =2.0mm", Part Number=FIDUCIAL_TARGET_C100-200, Pin Count=1, Sense=No, SMD=Yes, Socket=No, Status=None
FTG2 FTG3 FTG4: library part FIDUCIAL_TARGET_S100-200, "Fiducial Target", Author="CERN DEM JLC", ComponentHeight=0mm, Component Type="Standard (No BOM)", CreateDate=09.02.2010, Family=Fiducial, HelpURL=Undefined, LatestRevisionDate=04.04.2012, Mounted=No, PackageDescription="Square Fiducial Target, Top Layer, 1.0mm, Top Solder 2.0mm, Keepout =2.0mm", Part Description="Square Fiducial Target, Top Layer, 1.0mm, Top Solder 2.0mm, Keepout =2.0mm", Part Number=FIDUCIAL_TARGET_S100-200, Pin Count=1, Sense=No, SMD=Yes, Socket=No, Status=None
IC1 IC8: "Triple 2-Channel Analog Multiplexer/Demultiplexer", Case=SOIC16, Manufacturer="NXP SEMICONDUCTORS", Author="CERN DEM JLC", Bonding=No, Component Type=Standard, ComponentHeight=1.75mm, CreateDate=09.11.2016, Device=74HC4053D, HelpURL=\\cern.ch\dfs\Applications\Altium\Datasheets\74HC4053D.pdf, LatestRevisionDate=09.11.2016, Manufacturer Part Number=74HC4053D, Mounted=Yes, PackageDescription="SOIC 16, Pitch 1.27mm - Body 4x10mm, IPC Medium Density", Part Description="Triple 2-channel analog multiplexer/demultiplexer", Part Number=74HC4053D, Pin Count=16, PressFit=No, Sense=No, SMD=Yes, Socket=No
IC2 IC4 IC5: library part IFC_FIN1028, "3.3V LVDS 2-Bit High-Speed Differential Reciever", Case=SOIC8, Manufacturer="ON Semiconductor", Author=GK, Bonding=No, Component Type=Standard, ComponentHeight=0.8mm, CreateDate=08/11/2016, Device=FIN1028MX, HelpURL=\\cern.ch\dfs\Applications\Altium\Datasheets\FIN1101K8X.pdf, LatestRevisionDate=08/11/2016, Manufacturer Part Number=FIN1028MX, Mounted=Yes, PackageDescription="SOIC 8, Pitch 1.27mm - Body 4x5mm, IPC Medium Density", Part Description="3.3V LVDS 2-Bit High-Speed Differential Reciever", Part Number=FIN1028MX, Pin Count=8, PressFit=No, Sense=No, SMD=Yes, Socket=No
IC3: library part IFC_FIN1027A, "3.3V LVDS, 2-Bit, High-Speed, Differential Driver", Case=SOIC8, Manufacturer="ON Semiconductor", Author=GK, Bonding=No, Component Type=Standard, ComponentHeight=0.8mm, CreateDate=08/11/2016, Device=FIN1027AMX, HelpURL=\\cern.ch\dfs\Applications\Altium\Datasheets\FIN1101K8X.pdf, LatestRevisionDate=08/11/2016, Manufacturer Part Number=FIN1027AMX, Mounted=Yes, PackageDescription="SOIC 8, Pitch 1.27mm - Body 4x5mm, IPC Medium Density", Part Description="3.3V LVDS, 2-Bit, High-Speed, Differential Driver", Part Number=FIN1027AMX, Pin Count=8, PressFit=No, Sense=No, SMD=Yes, Socket=No
IC6: "Quadruple Bus Buffer with 3-State Outputs", Case=SOIC14, Manufacturer="TEXAS INSTRUMENTS", Author="CERN DEM JLC", Bonding=No, Component Type=Standard, ComponentHeight=1.75mm, CreateDate=30.06.2011, Device=SN74HC125D, HelpURL=\\cern.ch\dfs\Applications\Altium\Datasheets\SN74HC125D.pdf, LatestRevisionDate=30.06.2011, Manufacturer Part Number=SN74HC125D, Mounted=Yes, PackageDescription="SOIC 14, Pitch 1.27mm - Body 4x8.75mm, IPC Medium Density", Part Description="Quadruple Bus Buffer with 3-State Outputs", Part Number=SN74HC125D, Pin Count=14, PressFit=No, Sense=No, SMD=Yes, Socket=No
IC7A IC7B IC9A IC9B IC10A IC10B IC11A IC11B: "8-Bit Shift Register With 3-State Output Register", Case=TSSOP16, Manufacturer="TEXAS INSTRUMENTS", Author="CERN DEM JLC", Bonding=No, Component Type=Standard, ComponentHeight=1.2mm, CreateDate=10.05.2012, Device=SN74LV595APWT, HelpURL=\\cern.ch\dfs\Applications\Altium\Datasheets\SN74LV595APWT.pdf, LatestRevisionDate=10.05.2012, Manufacturer Part Number=SN74LV595APWT, Mounted=Yes, PackageDescription="SOP, 0.65mm pitch; 16 pin, 4.40mm W X 5.00mm L X 1.20mm H body IPC Medium Density", Part Description="8-Bit Shift Register With 3-State Output Register", Part Number=SN74LV595APWT, Pin Count=16, PressFit=No, Sense=No, SMD=Yes, Socket=No
IC12 IC16 IC17: Case=TSSOP14, Manufacturer="NXP SEMICONDUCTORS", Author="CERN DEM JLC", Bonding=No, Component Type=Standard, ComponentHeight=1.1mm, Device=74HC4066PW, HelpURL=\\cern.ch\dfs\Applications\Altium\Datasheets\74HC4066PW.pdf, Manufacturer Part Number=74HC4066PW, Mounted=Yes, PackageDescription="SOP, 14-Leads, Body 4.4x5mm (max), Pitch 0.65mm, IPC Medium Density", Part Description="Quad Single-Pole Single-Throw Analog Switch", Part Number=74HC4066PW, Pin Count=14, PressFit=No, SMD=Yes, Socket=No
  IC12 IC16: CreateDate=19.11.2014, LatestRevisionDate=19.11.2014, Sense=No
  IC17: CreateDate=2014-11-19, LatestRevisionDate=2014-11-19, Table="Standard Logic"
IC13: "Digital Temperature Sensor and Thermal Watchdog with Two-Wire Interface", Case=SSOP8, Manufacturer="TEXAS INSTRUMENTS", Author="CERN DEM JLC", Bonding=No, ComponentHeight=1.09mm, Component Type=Standard, CreateDate=15.10.2012, Device=LM75AIMM/NOPB, HelpURL=\\cern.ch\dfs\Applications\Altium\Datasheets\LM75AIMM-NOPB.pdf, LatestRevisionDate=15.10.2012, Manufacturer Part Number=LM75AIMM/NOPB, Mounted=Yes, PackageDescription="SOP, 0.65mm pitch; 8 pin,3.00mm W X 3.00mm L X 1.09mm H bodyI, PC Medium Density", Part Description="-25° to +100°C ±2°C Digital Temperature Sensor and Thermal Watchdog with Two-Wire Interface", Part Number=LM75AIMM/NOPB, Pin Count=8, PressFit=No, Sense=No, SMD=Yes, Socket=No